# Altium PCB Custom_Keyboard.PcbDoc (part 1 of 3)
Units mil, origin at the board's own origin, x right, y up, seen from the top; angles counter-clockwise.
Board outline 3302 x 1991 mil, 2 copper layers (Top Layer, Bottom Layer), stack 57 mil thick; 188 components, 152 nets, 718 pads, 297 vias.
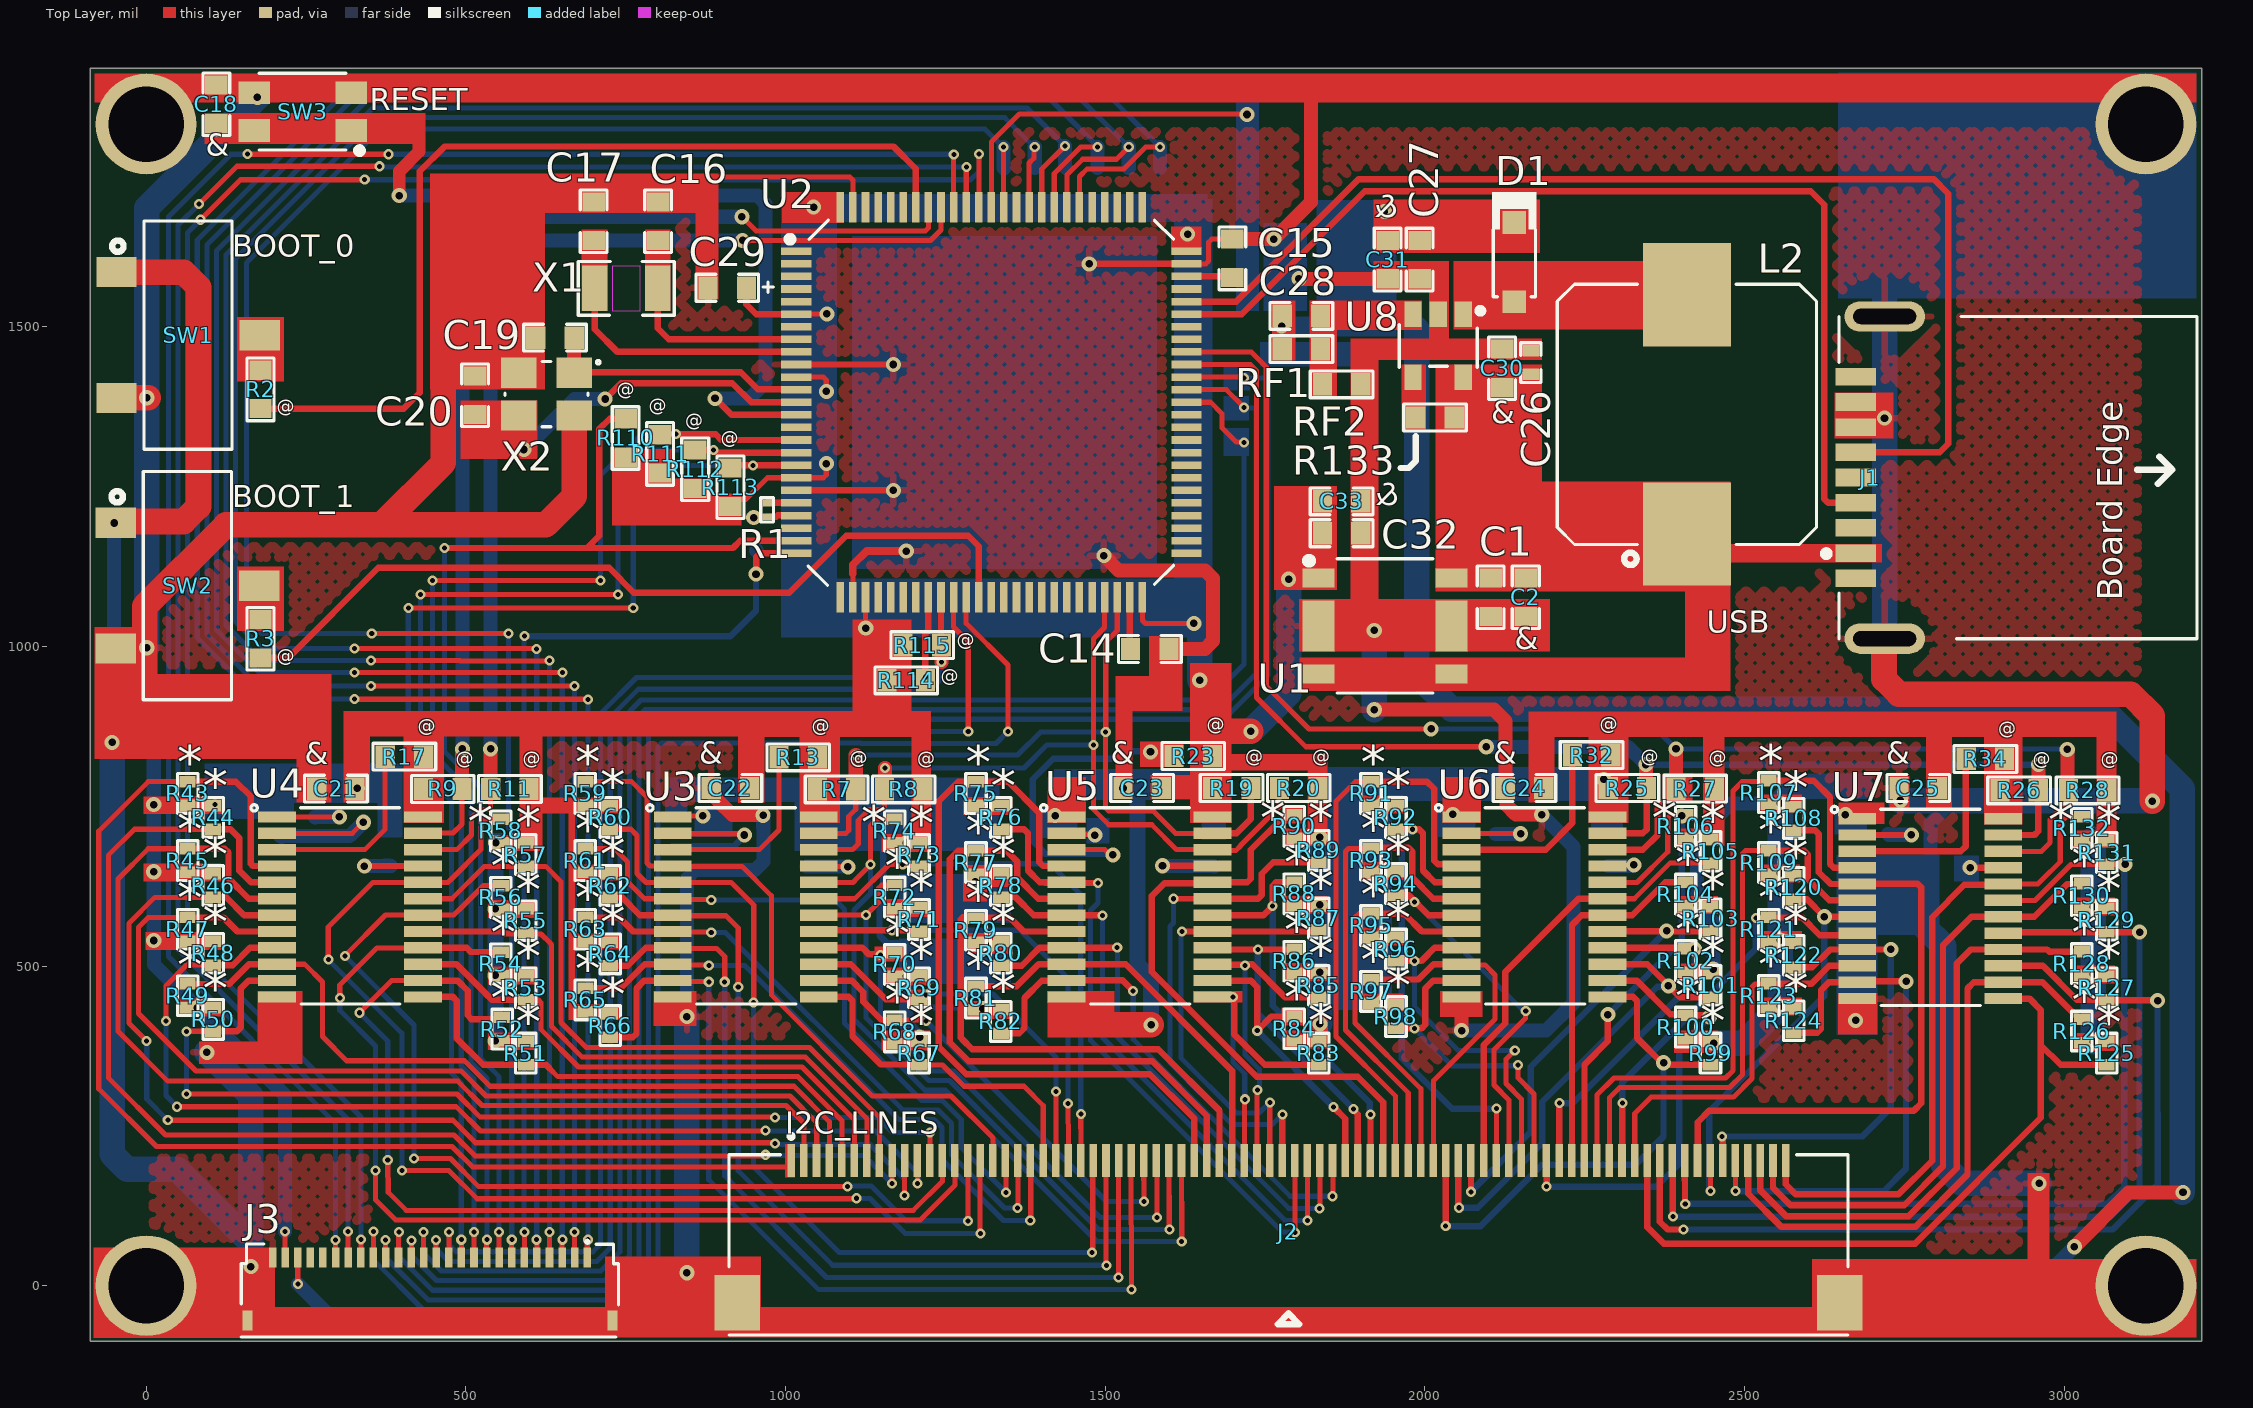
[diagram p0: Top Layer view]
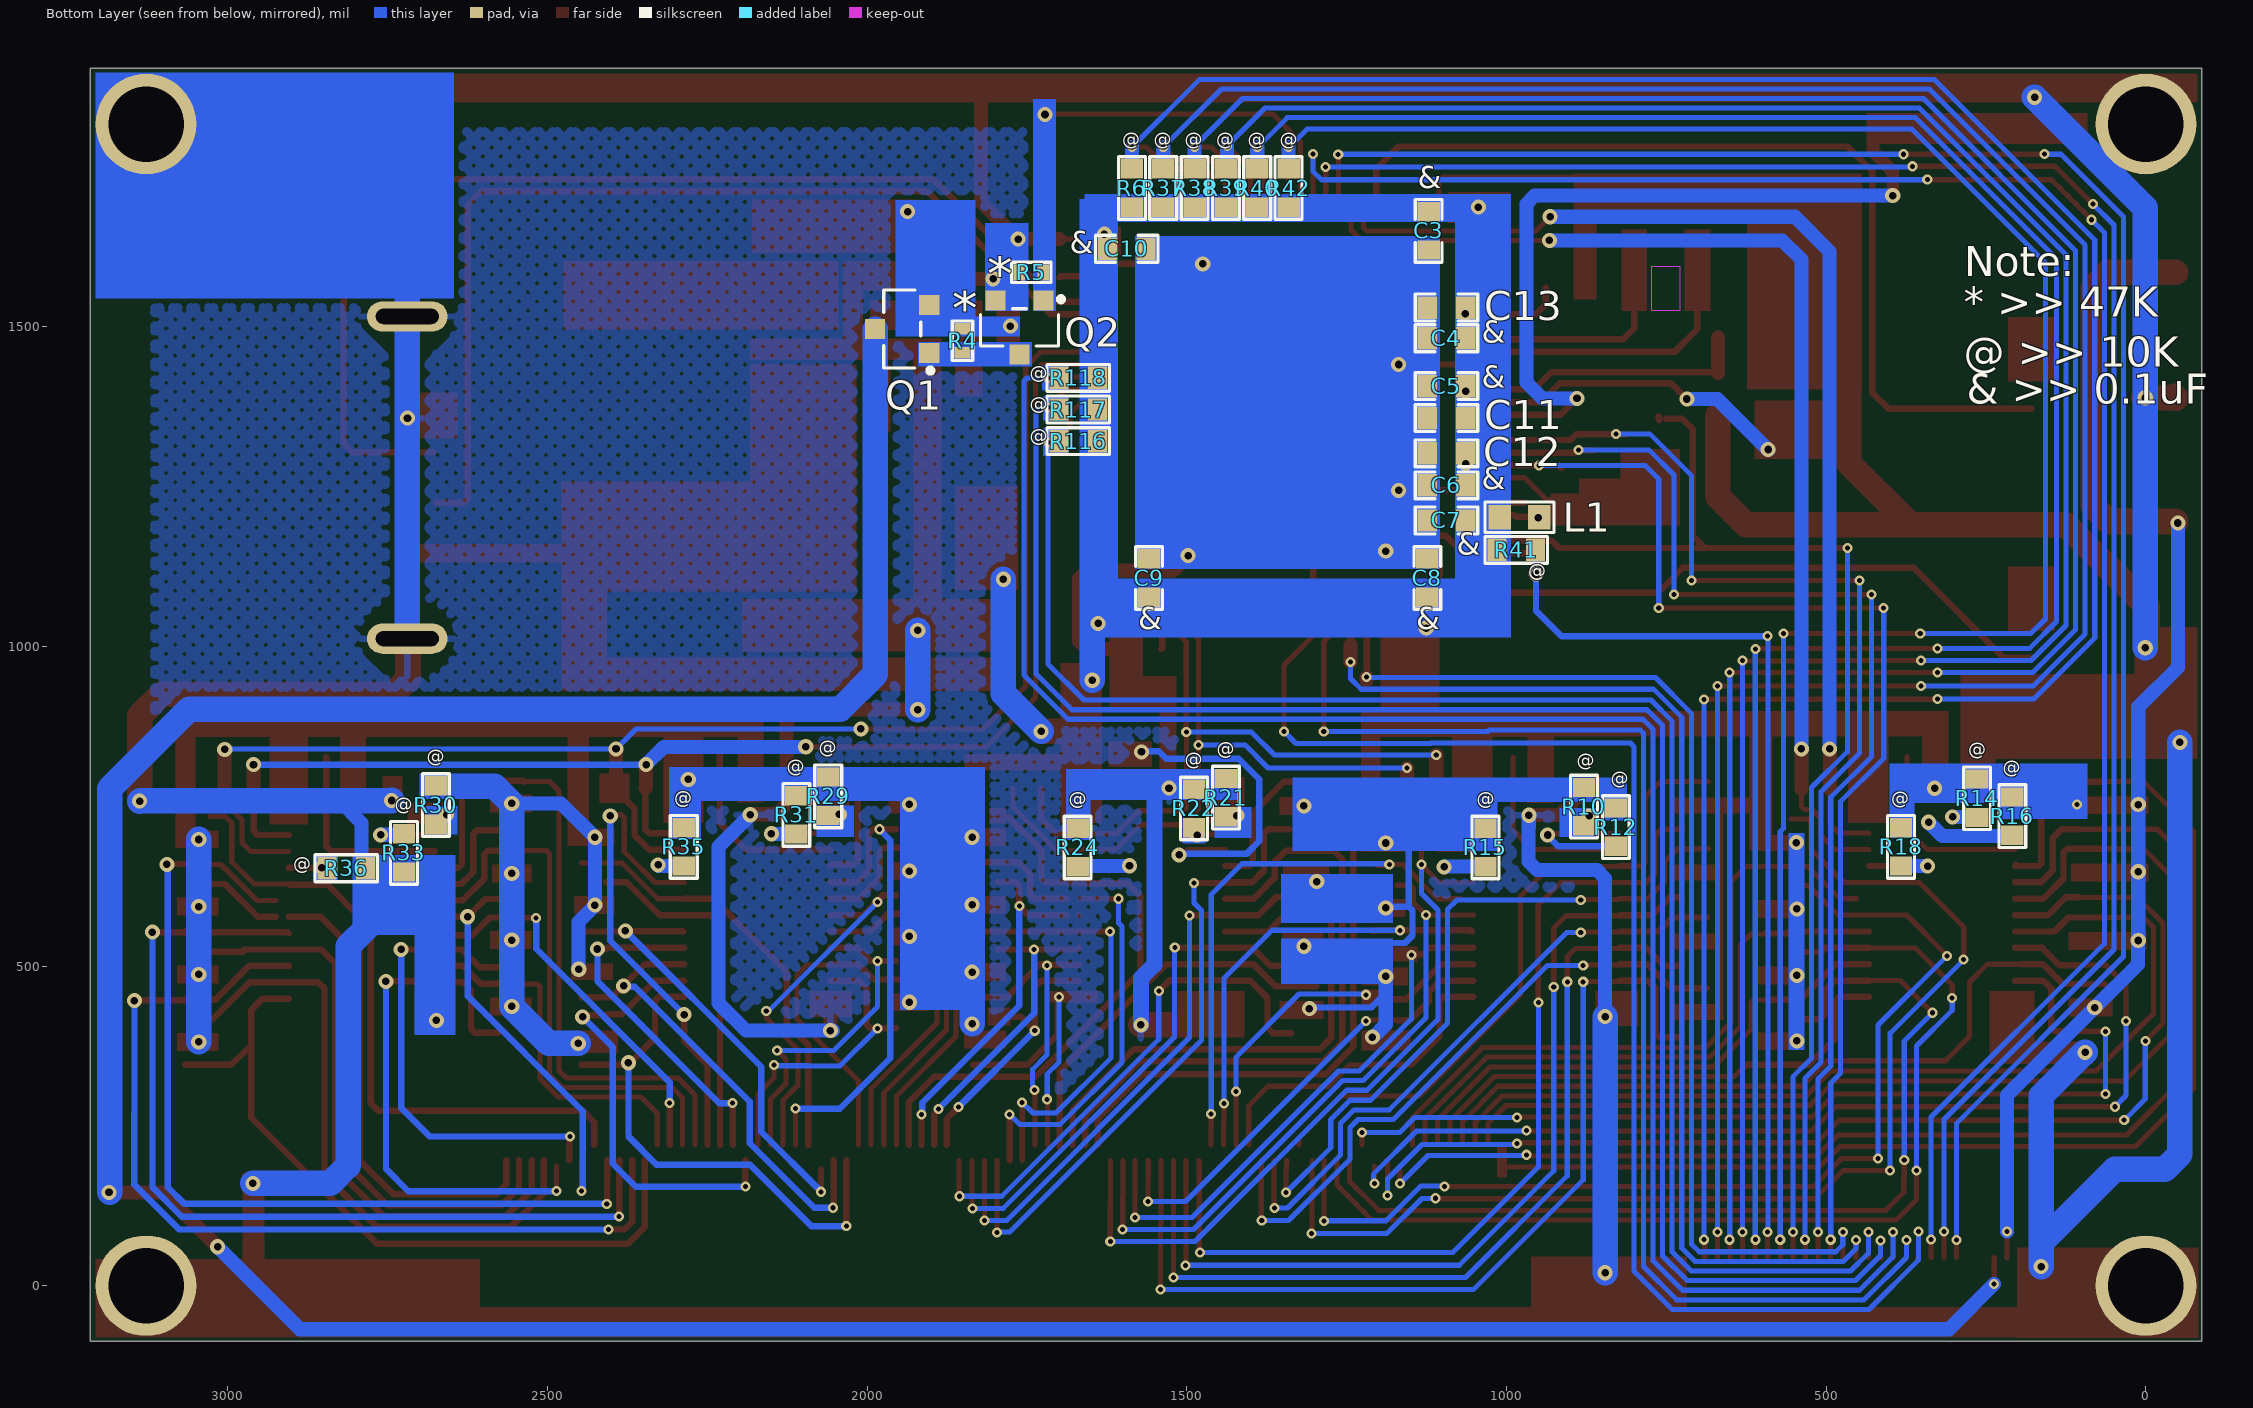
[diagram p1: Bottom Layer view, seen from below]
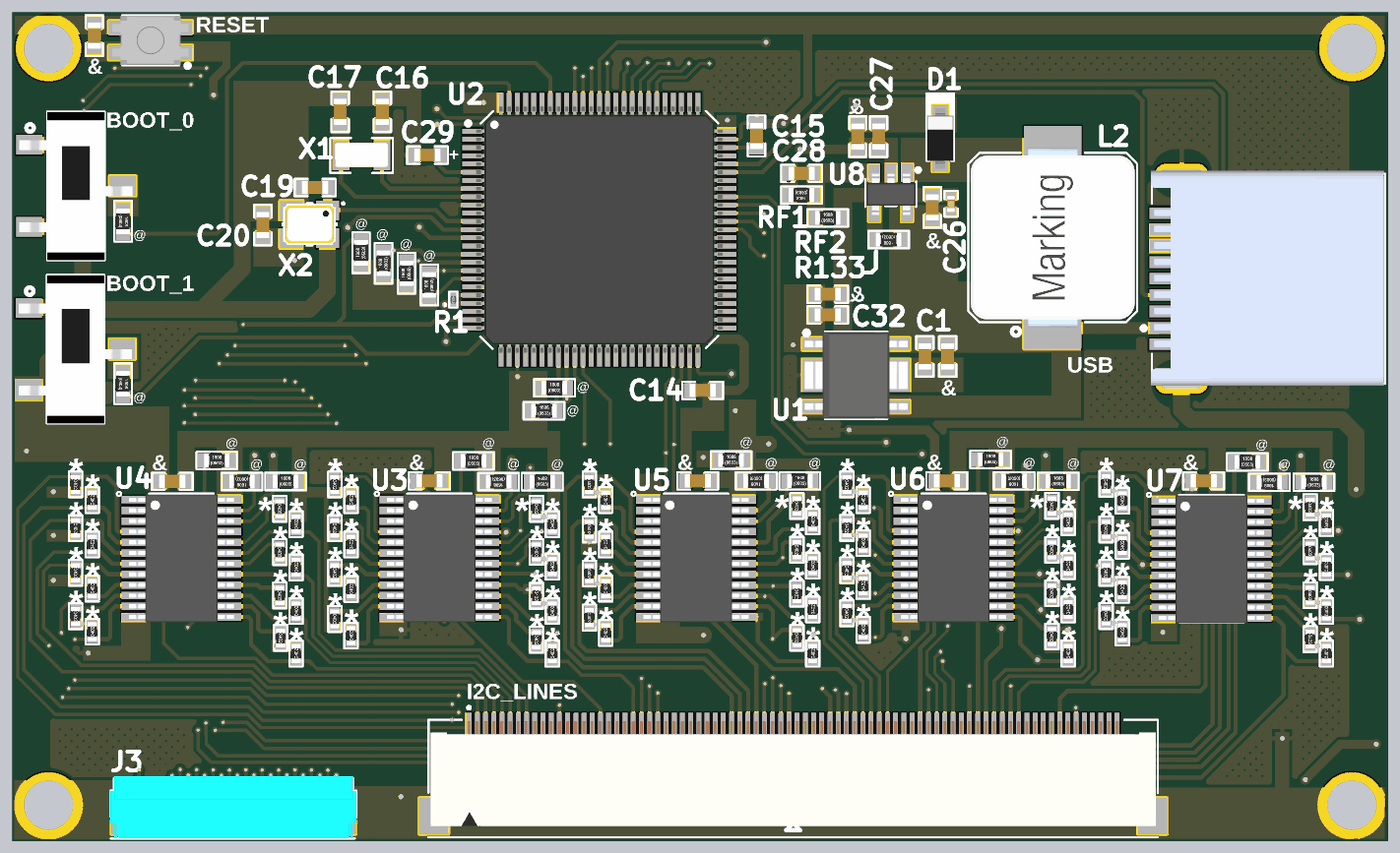
[diagram p3: 3D render of the assembled board from above, using the file's embedded part models]
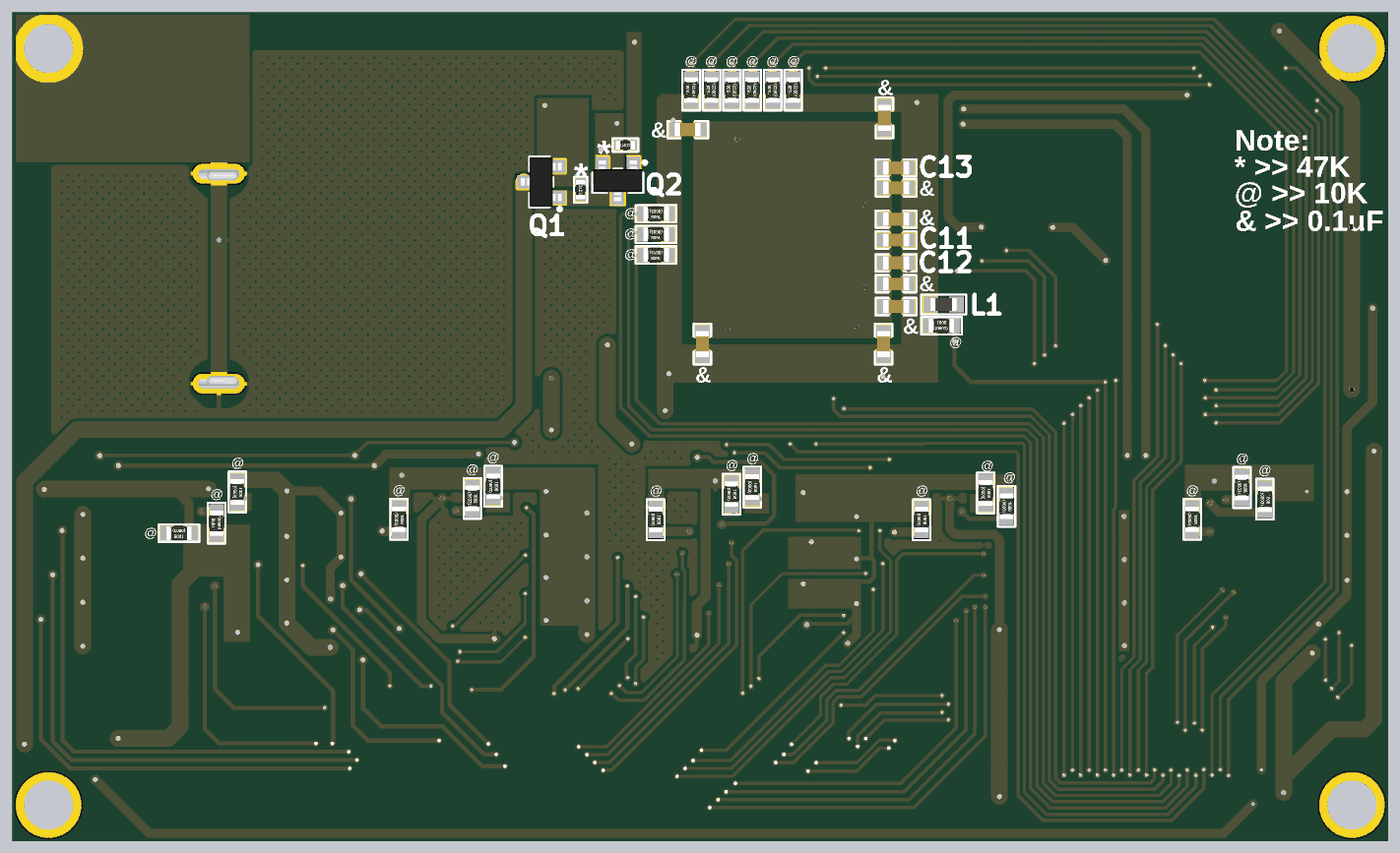
[diagram p4: 3D render of the assembled board from below, using the file's embedded part models]

## Layer stack, top to bottom
Top Solder: solder mask 3, Solder Resist, Dk 3.5
Top Layer: signal copper 10
Dielectric 1: dielectric 37, FR-4, Dk 4.8
Bottom Layer: signal copper 10
Bottom Solder: solder mask 3, Solder Resist, Dk 3.5

## Board outline
-87,-87 -87,1904 3215,1904 3215,-87

## Design rules (kind name [scope] priority, off if disabled: settings)
Clearance [All] p1: gap=7 ignorepadtopadclearanceinfootprint=FALSE except(0: Arc-Hole Track-Hole SMDPad-Hole THPad-Hole Via-Hole Fill-Hole Poly-Hole Region-Hole Text-Hole; 3: Arc-SMDPad Track-SMDPad SMDPad-SMDPad)
HoleSize [All] p1: absolutevalues=TRUE maxlimit=1000 minlimit=1 maxpercent=80.000 minpercent=20.000
HoleToHoleClearance [All] p1: gap=0 allowstackedmicrovias=TRUE
MinimumSolderMaskSliver [All] p1: minsoldermaskwidth=0
PolygonConnect [All] p1: connectstyle=Relief reliefconductorwidth=10 reliefentries=4 polygonreliefangle="90 Angle" airgapwidth=10
RoutingVias [All] p1: holewidth=11.81 width=23.62 viastyle="Through Hole" minholewidth=7.87 minwidth=15.75 maxholewidth=11.81 maxwidth=23.62
SilkToSilkClearance [All] p1: silktosilkclearance=0
SilkToSolderMaskClearance [IsPad] p1: minsilkscreentomaskgap=0 clearancetoexposedcopper=TRUE
SolderMaskExpansion [All] p1: expansion=4 istentingtop=FALSE
Width [All] p1: maxlimit=40 minlimit=8 preferedwidth=22
25 further rules are at their usual default settings.

## Classes and differential pairs
component class U_RPull_Section: R43 R44 R45 R46 R47 R48 R49 R50 R51 R52 R53 R54 R55 R56 R57 R58 R59 R60 R61 R62 R63 R64 R65 R66 R67 R68 R69 R70 R71 R72 R73 R74 R75 R76 R77 R78 R79 R80 R81 R82 R83 R84 R85 R86 R87 R88 R89 R90 R91 R92 R93 R94 R95 R96 R97 R98 R99 R100 R101 R102 R103 R104 R105 R106 R107 R108 R109 R120 R121 R122 R123 R124 R125 R126 R127 R128 R129 R130 R131 R132
component class U_Power_Section: C1 C2 C26 C27 C28 C30 C31 C32 C33 D1 L2 Q1 Q2 R4 R5 R133 RF1 RF2 U1 U8
component class U_Mux_Sheet_2: C24 C25 R25 R26 R27 R28 R29 R30 R31 R32 R33 R34 R35 R36 U6 U7
component class U_Mux_Sheet_1: C21 C22 C23 R7 R8 R9 R10 R11 R12 R13 R14 R15 R16 R17 R18 R19 R20 R21 R22 R23 R24 U3 U4 U5
component class U_Controller_Section_2: R6 R37 R38 R39 R40 R41 R42 R110 R111 R112 R113 R114 R115 R116 R117 R118
component class U_Controller_Section_1: C3 C4 C5 C6 C7 C8 C9 C10 C11 C12 C13 C14 C15 C16 C17 C18 C19 C20 C29 L1 R1 R2 R3 SW1 SW2 SW3 U2 X1 X2
component class U_Connector_Sheet: J1 J2 J3

## Components (designator, comment, footprint, x,y, rotation, side; value= is the part's Value field where it differs from the comment)
C1 "4.7UF" Cap0603#1 2103,1077 r270 top locked
C2 "0.1uF" Cap0603#1 2158,1077 r270 top locked
C3 "0.1uF" Cap0603#1 1122,1650 r270 bottom locked
C4 "0.1uF" Cap0603#1 1094,1482 r0 bottom locked
C5 "0.1uF" Cap0603#1 1094,1407 r0 bottom locked
C6 "0.1uF" Cap0603#1 1094,1252 r0 bottom locked
C7 "0.1uF" Cap0603#1 1094,1197 r0 bottom locked
C8 "0.1uF" Cap0603#1 1124,1107 r90 bottom locked
C9 "0.1uF" Cap0603#1 1559,1107 r90 bottom locked
C10 "0.1uF" Cap0603#1 1594,1622 r180 bottom locked
C11 "1uF" Cap0603#1 1094,1357 r0 bottom locked
C12 "1uF" Cap0603#1 1094,1302 r0 bottom locked
C13 "4.7UF" Cap0603#1 1094,1530 r0 bottom locked
C14 "2.2uF" Cap0603#1 1570,996 r0 top locked
C15 "2.2uF" Cap0603#1 1699,1607 r90 top locked
C16 "10pF" Cap0603#1 801,1665 r270 top locked
C17 "10pF" Cap0603#1 700,1665 r270 top locked
C18 "0.1uF" Cap0603#1 110,1848 r90 top locked
C19 "10pF" Cap0603#1 639.61,1482.93 r0 top locked
C20 "10pF" Cap0603#1 514.61,1392.93 r270 top locked
C21 "0.1uF" Cap0603#1 297,777.5 r180 top locked
C22 "0.1uF" Cap0603#2 914,778.5 r180 top locked
C23 "0.1uF" Cap0603#2 1558,778.5 r180 top locked
C24 "0.1uF" Cap0603#2 2156,778.5 r180 top locked
C25 "0.1uF" Cap0603#1 2772,778.5 r180 top locked
C26 "2.2uF" "Cap 0402" 2166,1444 r90 top locked
C27 "10uF" Cap0603#1 1992,1605 r270 top locked
C28 "220pF" Cap0603#1 1807,1517 r180 top locked
C29 "1uF" F981E105MMA 909,1561 r180 top locked
C30 "0.1uF" Cap0603#1 2121,1435 r90 top locked
C31 "0.1uF" Cap0603#1 1942,1605 r270 top locked
C32 "4.7UF" Cap0603#1 1870,1177 r0 top locked
C33 "0.1uF" Cap0603#1 1870,1227 r0 top locked
D1 "MBR0520" SOD123 2140,1600.99 r90 top locked
J1 "U231-091N-4BLRA00-S" U231-091N-4BLRA00-S 2802.94,1264.11 r90 top
J2 "046288080000846+" 046288080000846+ 1786.84,84.79 r0 top locked
J3 "FH34SRJ-26S-0.5SH(50)" FH34SRJ-26S-0.5SH(50) 444.01,-5.21 r0 top locked
L1 "FBMH1608HL121-TV" "IND 0603" 979.91,1202 r180 bottom locked
L2 "3.3UH" 74437368033 2410,1363 r90 top locked
Q1 "FDN338P" SOT23-3 1945.32,1496.41 r90 bottom locked
Q2 "FDN335N" SOT23-3 1762,1499 r0 bottom locked
R1 "0R" Res-0201 971.39,1213.57 r270 top locked
R2 "10K" Res0603 179,1402 r90 top locked
R3 "10K" Res0603 179,1012 r90 top locked
R4 "47K" Res0402#1 1851,1478 r270 bottom locked
R5 "47K" Res0402#1 1743.5,1585 r180 bottom locked
R6 "10K" Res0603 1586,1717 r270 bottom locked
R7 "10K" Res0603 1080,776.5 r0 top locked
R8 "10K" Res0603 1185,776.5 r180 top locked
R9 "10K" Res0603 464,777 r0 top locked
R10 "10K" Res0603 879,749.5 r90 bottom locked
R11 "10K" Res0603 569,777 r180 top locked
R12 "10K" Res0603 829,717.5 r90 bottom locked
R13 "10K" Res0603 1020,826.5 r180 top locked
R14 "10K" Res0603 264,762.5 r90 bottom locked
R15 "10K" Res0603 1033,685.5 r90 bottom locked
R16 "10K" Res0603 209,734.5 r90 bottom locked
R17 "10K" Res0603 404,827.5 r180 top locked
R18 "10K" Res0603 383,686.5 r90 bottom locked
R19 "10K" Res0603 1698,778.5 r0 top locked
R20 "10K" Res0603 1803,778.5 r180 top locked
R21 "10K" Res0603 1439,763.5 r90 bottom locked
R22 "10K" Res0603 1489,746.5 r90 bottom locked
R23 "10K" Res0603 1638,828.5 r180 top locked
R24 "10K" Res0603 1671,685.5 r90 bottom locked
R25 "10K" Res0603 2317,778.5 r0 top locked
R26 "10K" Res0603 2929.65,774.93 r0 top locked
R27 "10K" Res0603 2423,777.5 r180 top locked
R28 "10K" Res0603 3036.65,774.93 r180 top locked
R29 "10K" Res0603 2061,765.5 r90 bottom locked
R30 "10K" Res0603 2674.65,751.93 r90 bottom locked
R31 "10K" Res0603 2111,736.5 r90 bottom locked
R32 "10K" Res0603 2261,830 r180 top locked
R33 "10K" Res0603 2724.65,676.93 r270 bottom locked
R34 "10K" Res0603 2877,824 r180 top locked
R35 "10K" Res0603 2287,686.5 r90 bottom locked
R36 "10K" Res0603 2815,653 r180 bottom locked
R37 "10K" Res0603 1537,1717 r270 bottom locked
R38 "10K" Res0603 1488,1717 r270 bottom locked
R39 "10K" Res0603 1439,1717 r270 bottom locked
R40 "10K" Res0603 1390,1717 r270 bottom locked
R41 "10K" Res0603 985,1151 r0 bottom
R42 "10K" Res0603 1341,1717 r270 bottom locked
R43 "47K" Res0402#1 65,770 r270 top locked
R44 "47K" Res0402#1 105,732.5 r90 top locked
R45 "47K" Res0402#1 65,665 r270 top locked
R46 "47K" Res0402#1 105,626 r90 top locked
R47 "47K" Res0402#1 65,557.5 r270 top locked
R48 "47K" Res0402#1 105,520 r90 top locked
R49 "47K" Res0402#1 65,453.5 r270 top locked
R50 "47K" Res0402#1 105,416.5 r90 top locked
R51 "47K" Res0402#1 594,363.93 r90 top locked
R52 "47K" Res0402#1 557,401.5 r270 top locked
R53 "47K" Res0402#1 594,466 r90 top locked
R54 "47K" Res0402#1 555,503.5 r270 top locked
R55 "47K" Res0402#1 594,571 r90 top locked
R56 "47K" Res0402#1 555,607.5 r270 top locked
R57 "47K" Res0402#1 594,674.5 r90 top locked
R58 "47K" Res0402#1 555,711.5 r270 top locked
R59 "47K" Res0402#2 687,770 r270 top locked
R60 "47K" Res0402#2 726,732.5 r90 top locked
R61 "47K" Res0402#3 687,665 r270 top locked
R62 "47K" Res0402#1 726,626 r90 top locked
R63 "47K" Res0402#1 687,557.5 r270 top locked
R64 "47K" Res0402#2 726,519 r90 top locked
R65 "47K" Res0402#2 687,447 r270 top locked
R66 "47K" Res0402#2 726,407 r90 top locked
R67 "47K" Res0402#1 1209,363.93 r90 top locked
R68 "47K" Res0402#2 1171,397 r270 top locked
R69 "47K" Res0402#2 1209,466 r90 top locked
R70 "47K" Res0402#2 1171,502.5 r270 top locked
R71 "47K" Res0402#2 1209,573 r90 top locked
R72 "47K" Res0402#2 1171,608 r270 top locked
R73 "47K" Res0402#2 1209,674.5 r90 top locked
R74 "47K" Res0402#2 1171,711.5 r270 top locked
R75 "47K" Res0402#2 1298,770 r270 top locked
R76 "47K" Res0402#2 1337,732.5 r90 top locked
R77 "47K" Res0402#2 1298,662 r270 top locked
R78 "47K" Res0402#2 1337,626 r90 top locked
R79 "47K" Res0402#2 1298,556 r270 top locked
R80 "47K" Res0402#2 1337,520 r90 top locked
R81 "47K" Res0402#2 1298,450 r270 top locked
R82 "47K" Res0402#1 1337,413.5 r90 top locked
R83 "47K" Res0402#1 1834,363.93 r90 top locked
R84 "47K" Res0402#2 1796,402 r270 top locked
R85 "47K" Res0402#2 1834,470 r90 top locked
R86 "47K" Res0402#2 1796,507.5 r270 top locked
R87 "47K" Res0402#2 1834,575 r90 top locked
R88 "47K" Res0402#2 1796,613 r270 top locked
R89 "47K" Res0402#2 1834,681 r90 top locked
R90 "47K" Res0402#2 1796,718.5 r270 top locked
R91 "47K" Res0402#2 1916,770 r270 top locked
R92 "47K" Res0402#2 1955,732.5 r90 top locked
R93 "47K" Res0402#2 1916,665.5 r270 top locked
R94 "47K" Res0402#2 1955,629 r90 top locked
R95 "47K" Res0402#2 1916,563.5 r270 top locked
R96 "47K" Res0402#2 1955,526.5 r90 top locked
R97 "47K" Res0402#2 1916,460.5 r270 top locked
R98 "47K" Res0402#2 1955,421 r90 top locked
R99 "47K" Res0402#2 2447,363.93 r90 top locked
R100 "47K" Res0402#2 2408,404.5 r270 top locked
R101 "47K" Res0402#2 2447,470 r90 top locked
R102 "47K" Res0402#2 2408,508.5 r270 top locked
R103 "47K" Res0402#2 2447,574 r90 top locked
R104 "47K" Res0402#2 2408,612.5 r270 top locked
R105 "47K" Res0402#2 2447,679.5 r90 top locked
R106 "47K" Res0402#2 2408,718.5 r270 top locked
R107 "47K" Res0402#1 2538,771.43 r270 top locked
R108 "47K" Res0402#1 2577,730.93 r90 top locked
R109 "47K" Res0402#1 2538,662 r270 top locked
R110 "10K" Res0603 750,1326 r270 top locked
R111 "10K" Res0603 804,1301 r270 top locked
R112 "10K" Res0603 859,1277 r270 top locked
R113 "10K" Res0603 914,1249 r270 top locked
R114 "10K" Res0603 1189,947 r180 top locked
R115 "10K" Res0603 1214,1002 r180 top locked
R116 "10K" Res0603 1670,1321 r180 bottom locked
R117 "10K" Res0603 1670,1370.5 r180 bottom locked
R118 "10K" Res0603 1670,1420 r180 bottom locked
R120 "47K" Res0402#1 2577,623 r90 top locked
R121 "47K" Res0402#1 2538,557.5 r270 top locked
R122 "47K" Res0402#1 2577,517 r90 top locked
R123 "47K" Res0402#1 2538,453.93 r270 top locked
R124 "47K" Res0402#1 2577,414.43 r90 top locked
R125 "47K" Res0402#1 3066.65,363.93 r90 top locked
R126 "47K" Res0402#1 3027.65,398.43 r270 top locked
R127 "47K" Res0402#1 3066.65,465.93 r90 top locked
R128 "47K" Res0402#1 3027.65,503.93 r270 top locked
R129 "47K" Res0402#1 3066.65,571.93 r90 top locked
R130 "47K" Res0402#1 3027.65,609.93 r270 top locked
R131 "47K" Res0402#1 3066.65,677.43 r90 top locked
R132 "47K" Res0402#1 3027.65,715.43 r270 top locked
R133 "51K" Res0603 2016,1358 r0 top locked
RF1 "68K" Res0603 1807,1465 r0 top locked
RF2 "13.3K" Res0603 1870,1410 r180 top locked
SW1 "SS-3235D-03-L2" SS-3235D-03-L2 65.8,1487 r270 top locked
SW2 "SS-3235D-03-L2" SS-3235D-03-L2 64.8,1095 r270 top locked
SW3 "TS-1185EC-C-D-B" TS-1185EC-C-D-B 244.79,1836.47 r180 top locked
U1 "S-1172B33-E6T1U" HSOP-6 1938,1032 r0 top locked
U2 "STM32F407VGT7TR" LQFP-100 1322.11,1381.88 r0 top locked
U3 "TCA9548APWR" 24-TSSOP 938,592.5 r0 top locked
U4 "TCA9548APWR" 24-TSSOP 319,592.5 r0 top locked
U5 "TCA9548APWR" 24-TSSOP 1554,592.5 r0 top locked
U6 "TCA9548APWR" 24-TSSOP 2171.83,592.5 r0 top locked
U7 "TCA9548APWR" 24-TSSOP 2790.83,589.93 r0 top locked
U8 "LM27313XMF/NOPB" SOT23-5 2021,1470 r270 top locked
X1 "32.768KHz" Q13FC1350000200 751,1560 r180 top locked
X2 "25MHz" S3225000101040 626.31,1394.46 r180 top locked

## Footprints (in the part's own frame and the unit in brackets; to place one, negate y for a bottom-side part, rotate by r counter-clockwise, add the part's x,y. Pads: shape width x height; smd on the part's side, far side on the other; paste and mask are expansions set on the pad)
24-TSSOP [mm] "IC BUS SWITCH 1 X 8:1 24TSSOP"
  rect 1.5x0.45 smd: 1(-2.9,3.575) 2(-2.9,2.925) 3(-2.9,2.275) 4(-2.9,1.625) 5(-2.9,0.975) 6(-2.9,0.325) 7(-2.9,-0.325) 8(-2.9,-0.975) 9(-2.9,-1.625) 10(-2.9,-2.275) 11(-2.9,-2.925) 12(-2.9,-3.575) 13(2.9,-3.575) 14(2.9,-2.925) 15(2.9,-2.275) 16(2.9,-1.625) 17(2.9,-0.975) 18(2.9,-0.325) 19(2.9,0.325) 20(2.9,0.975) 21(2.9,1.625) 22(2.9,2.275) 23(2.9,2.925) 24(2.9,3.575)
  silkscreen extent -3.94,-3.85 1.99,4.06, body extent -3.2,-3.9 3.2,3.9, height 1.2
74437368033 [mm]
  rect 4.1x3.5 smd: 1(-4.75,0) 2(4.75,0)
  silkscreen extent -5.99,-5.15 5.17,5.15, body extent -5.5,-5 5.5,5, height 3.7
046288080000846+ [mm]
  rect 0.3x1.3 smd: 1(-19.75,2.825) 2(-19.25,2.825) 3(-18.75,2.825) 4(-18.25,2.825) 5(-17.75,2.825) 6(-17.25,2.825) 7(-16.75,2.825) 8(-16.25,2.825) 9(-15.75,2.825) 10(-15.25,2.825) 11(-14.75,2.825) 12(-14.25,2.825) 13(-13.75,2.825) 14(-13.25,2.825) 15(-12.75,2.825) 16(-12.25,2.825) 17(-11.75,2.825) 18(-11.25,2.825) 19(-10.75,2.825) 20(-10.25,2.825) 21(-9.75,2.825) 22(-9.25,2.825) 23(-8.75,2.825) 24(-8.25,2.825) 25(-7.75,2.825) 26(-7.25,2.825) 27(-6.75,2.825) 28(-6.25,2.825) 29(-5.75,2.825) 30(-5.25,2.825) 31(-4.75,2.825) 32(-4.25,2.825) 33(-3.75,2.825) 34(-3.25,2.825) 35(-2.75,2.825) 36(-2.25,2.825) 37(-1.75,2.825) 38(-1.25,2.825) 39(-0.75,2.825) 40(-0.25,2.825) 41(0.25,2.825) 42(0.75,2.825) 43(1.25,2.825) 44(1.75,2.825) 45(2.25,2.825) 46(2.75,2.825) 47(3.25,2.825) 48(3.75,2.825) 49(4.25,2.825) 50(4.75,2.825) 51(5.25,2.825) 52(5.75,2.825) 53(6.25,2.825) 54(6.75,2.825) 55(7.25,2.825) 56(7.75,2.825) 57(8.25,2.825) 58(8.75,2.825) 59(9.25,2.825) 60(9.75,2.825) 61(10.25,2.825) 62(10.75,2.825) 63(11.25,2.825) 64(11.75,2.825) 65(12.25,2.825) 66(12.75,2.825) 67(13.25,2.825) 68(13.75,2.825) 69(14.25,2.825) 70(14.75,2.825) 71(15.25,2.825) 72(15.75,2.825) 73(16.25,2.825) 74(16.75,2.825) 75(17.25,2.825) 76(17.75,2.825) 77(18.25,2.825) 78(18.75,2.825) 79(19.25,2.825) 80(19.75,2.825)
  rect 1.8x2.2 smd: MP1(-21.9,-2.825) MP2(21.9,-2.825)
  silkscreen extent -22.22,-4.11 22.23,3.84, body extent -22.1,-3.43 22.1,2.97, height 2.1
Cap0603#1 [mil]
  rect 30x35 smd mask+2.36: 1(-30,0) 2(30,0)
  silkscreen extent -49,-21 49,21, body extent -32,-16 31,16, height 34
Cap0603#2 [mil]
  rect 30x35 smd: 1(-30,0) 2(30,0)
  silkscreen extent -49,-21 49,21, body extent -32,-16 31,16, height 34
"Cap 0402" [mil]
  rect 18x25 smd mask+2.36: 1(-18.5,0) 2(18.5,0)
  silkscreen extent -31,-16 31,16, body extent -20,-10 20,10, height 19
F981E105MMA [mil]
  rect 30x35 smd mask+2.36: 1(-30,0) 2(30,0)
  silkscreen extent -72,-21 49,21, body extent -32,-16 31,16, height 34
FH34SRJ-26S-0.5SH(50) [mm] "CONN FFC FPC 26POS 0.50MM R/A"
  rect 0.3x0.8 smd: 1(6.25,1.25) 2(5.75,1.25) 3(5.25,1.25) 4(4.75,1.25) 5(4.25,1.25) 6(3.75,1.25) 7(3.25,1.25) 8(2.75,1.25) 9(2.25,1.25) 10(1.75,1.25) 11(1.25,1.25) 12(0.75,1.25) 13(0.25,1.25) 14(-0.25,1.25) 15(-0.75,1.25) 16(-1.25,1.25) 17(-1.75,1.25) 18(-2.25,1.25) 19(-2.75,1.25) 20(-3.25,1.25) 21(-3.75,1.25) 22(-4.25,1.25) 23(-4.75,1.25) 24(-5.25,1.25) 25(-5.75,1.25) 26(-6.25,1.25)
  rect 0.4x0.8 smd: MP1(-7.25,-1.25) MP2(7.25,-1.25)
  silkscreen extent -7.49,-1.91 7.49,1.94, body extent -7.5,-1.9 7.5,1.9, height 1
HSOP-6 [mm] "1A 60dB@(1kHz) 100mV@(300mA) Fixed 3.3V~3.3V Positive 1 5.5V HSOP-6"
  rect 1.27x0.76 smd: 1(-2.64,1.91) 3(-2.64,-1.91) 4(2.64,-1.91) 6(2.64,1.91)
  rect 1.27x2.03 smd: 2(-2.64,0) 5(2.64,0)
  silkscreen extent -3.15,-2.67 1.91,2.72, body extent -3.14,-2.65 3.14,2.65, height 1.6
"IND 0603" [mm]
  rect 0.9x0.97 smd: 1(-0.785,0) 2(0.785,0)
  silkscreen extent -1.37,-0.61 1.37,0.61, body extent -0.8,-0.4 0.8,0.4, height 0.76
LQFP-100 [mm]
  rect 1.2x0.3 smd: 1(-7.75,6) 2(-7.75,5.5) 3(-7.75,5) 4(-7.75,4.5) 5(-7.75,4) 6(-7.75,3.5) 7(-7.75,3) 8(-7.75,2.5) 9(-7.75,2) 10(-7.75,1.5) 11(-7.75,1) 12(-7.75,0.5) 13(-7.75,0) 14(-7.75,-0.5) 15(-7.75,-1) 16(-7.75,-1.5) 17(-7.75,-2) 18(-7.75,-2.5) 19(-7.75,-3) 20(-7.75,-3.5) 21(-7.75,-4) 22(-7.75,-4.5) 23(-7.75,-5) 24(-7.75,-5.5) 25(-7.75,-6) 51(7.75,-6) 52(7.75,-5.5) 53(7.75,-5) 54(7.75,-4.5) 55(7.75,-4) 56(7.75,-3.5) 57(7.75,-3) 58(7.75,-2.5) 59(7.75,-2) 60(7.75,-1.5) 61(7.75,-1) 62(7.75,-0.5) 63(7.75,0) 64(7.75,0.5) 65(7.75,1) 66(7.75,1.5) 67(7.75,2) 68(7.75,2.5) 69(7.75,3) 70(7.75,3.5) 71(7.75,4) 72(7.75,4.5) 73(7.75,5) 74(7.75,5.5) 75(7.75,6)
  rect 0.3x1.2 smd: 26(-6,-7.75) 27(-5.5,-7.75) 28(-5,-7.75) 29(-4.5,-7.75) 30(-4,-7.75) 31(-3.5,-7.75) 32(-3,-7.75) 33(-2.5,-7.75) 34(-2,-7.75) 35(-1.5,-7.75) 36(-1,-7.75) 37(-0.5,-7.75) 38(0,-7.75) 39(0.5,-7.75) 40(1,-7.75) 41(1.5,-7.75) 42(2,-7.75) 43(2.5,-7.75) 44(3,-7.75) 45(3.5,-7.75) 46(4,-7.75) 47(4.5,-7.75) 48(5,-7.75) 49(5.5,-7.75) 50(6,-7.75) 76(6,7.75) 77(5.5,7.75) 78(5,7.75) 79(4.5,7.75) 80(4,7.75) 81(3.5,7.75) 82(3,7.75) 83(2.5,7.75) 84(2,7.75) 85(1.5,7.75) 86(1,7.75) 87(0.5,7.75) 88(0,7.75) 89(-0.5,7.75) 90(-1,7.75) 91(-1.5,7.75) 92(-2,7.75) 93(-2.5,7.75) 94(-3,7.75) 95(-3.5,7.75) 96(-4,7.75) 97(-4.5,7.75) 98(-5,7.75) 99(-5.5,7.75) 100(-6,7.75)
  silkscreen extent -8.13,-7.27 7.24,7.24, body extent -8,-8 8,8, height 1.6
Q13FC1350000200 [mm] "CRYSTAL 32.7680KHZ 7PF SMD"
  rect 1x1.8 smd: 1(-1.25,0) 2(1.25,0)
  Keep-Out Layer region: -0.559,-0.889 0.559,-0.889 0.559,0.889 -0.559,0.889
  silkscreen extent -1.91,-1.07 1.91,1.07, body extent -1.6,-0.78 1.6,0.72, height 0.87
Res0402#1 [mil]
  rect 18x25 smd mask+4: 1(-18.5,0) 2(18.5,0)
  silkscreen extent -32,-17 32,16, body extent -23,-11 23,11, height 16
Res0402#2 [mil]
  rect 18x25 smd: 1(-18.5,0) 2(18.5,0)
  silkscreen extent -32,-17 32,16, body extent -23,-11 23,11, height 16
Res0402#3 [mil]
  rect 18x25 smd mask+4: 1(-18.5,0)
  rect 18x25 smd: 2(18.5,0)
  silkscreen extent -32,-17 32,16, body extent -23,-11 23,11, height 16
Res0603 [mil]
  rect 30x35 smd: 1(-30,0) 2(30,0)
  silkscreen extent -49,-21 49,21, body extent -31,-17 31,17, height 18
Res-0201 [mm]
  rect 0.27x0.37 smd: 1(-0.275,0) 2(0.275,0)
  silkscreen extent -0.48,-0.25 0.48,0.25, body extent -0.3,-0.15 0.3,0.15, height 0.29
S3225000101040 [mm] "25MHz SMD Crystal Resonator 10pF 40O ±10ppm"
  rect 1.4x1.2 smd: 1(-1.1,-0.85) 2(1.1,-0.85) 3(1.1,0.85) 4(-1.1,0.85)
  silkscreen extent -2.13,-1.34 1.65,1.3, body extent -1.6,-1.25 1.6,1.25, height 0.82
SOD123 [mm]
  rect 0.9x0.95 smd: 1(-1.575,0) 2(1.575,0)
  silkscreen extent -1.37,-0.89 2.79,0.89, body extent -1.85,-0.8 1.85,0.8, height 1.27
SOT23-3 [mm] "SOT23, 3-Leads, Body 2.9x1.3mm, Pitch 0.95mm, Lead Span 2.3mm - Reverse Pinning, IPC High Density"
  rect 0.8x0.8 smd: 1(-0.95,-1.075) 2(0.95,-1.075) 3(0,1.075)
  silkscreen extent -1.73,-1.19 1.55,0.74, body extent -1.5,-1.25 1.5,1.25, height 1.05
SOT23-5 [mil] "SOT23-5 Package"
  rect 40x27 smd: 1(-49.21,39.37) 2(-49.21,0) 3(-49.21,-39.37) 4(49.21,-39.37) 5(49.21,39.37)
  silkscreen extent -59,-61 33,70, body extent -46,-58 53,60, height 43
SS-3235D-03-L2 [mm] "SPDT 50mA @ 12VDC 12V On-On SMD Toggle Switches RoHS"
  rect 1.2x1.6 smd: 1(-2.5,-2.85) 3(2.5,-2.85)
  rect 1.21x1.6 smd: 2(0,2.85)
  silkscreen extent -4.53,-3.02 4.54,1.75, body extent -4.5,-3.45 4.55,3.45, height 6.4
TS-1185EC-C-D-B [mm]
  rect 1.25x0.9 smd: 1(-1.925,0.75) 1(1.925,0.75) 2(-1.925,-0.75) 2(1.925,-0.75)
  silkscreen extent -2.39,-1.52 1.73,1.68, body extent -2.33,-1.5 2.32,1.5, height 2
U231-091N-4BLRA00-S [mm] "USB 3.0 1 Surface Mount 9 Female -40?~+85? Type-A SMD USB Connectors ROHS"
  rect 0.7x1.6 smd: 1(-3,3.275) 2(-1,3.275) 3(1,3.275) 4(3,3.275) 5(4,3.275) 6(2,3.275) 7(0,3.275) 8(-2,3.275) 9(-4,3.275)
  oval 1.2x3.2 hole 0.6 slot 2.5 at 90 deg: MH1(-6.4,2.125) MH2(6.4,2.125)
  silkscreen extent -6.4,-10.28 6.4,4.57, body extent -6.52,-10.2 6.58,4, height 6.98

## Part data
C1 C13 C32: library part CL10A475KA8NQNC, "CAP CER 4.7UF 25V X5R 0603", Capacitance=4.7uF, Case Code (Imperial)=0603, Case Code (Metric)=1608, Dielectric=X5R, Manufacturer=Samsung, Max Operating Temperature=85°C, Min Operating Temperature=-55°C, Package Quantity=1, Supplier Part Number 1=1276-1900-1-ND, Tolerance=10%, Voltage Rating=25V, Case/Package=0603, ComponentLink1Description=http://www.samsungsem.com/kr/support/product-search/mlcc/CL10A475KA8NQNC.jsp?src-supplier=Digi-Key, ComponentLink1URL=http://www.samsungsem.com/kr/support/product-search/mlcc/CL10A475KA8NQNC.jsp?src-supplier=Digi-Key, Contact Plating=Tin, Depth=0.8mm, Lead Free="Lead Free", Length=1.6mm, Manufacturer Part Number=CL10A475KA8NQNC, Mount="Surface Mount", Packaging="Tape and Reel", Pricing 1="1=0.37, 10=0.255, 100=0.1528, 500=0.11456, 1000=0.09675 (USD)", Stock 1=2252340, Supplier 1=Digi-Key, Termination=Wraparound, Thickness=0.035inch, Width=0.031inch
C2 C3 C4 C5 C6 C7 C8 C9 C10 C18 C21 C22 C23 C24 C25 C30 C31 C33: library part CC0603ZRY5V9BB104, "CAP CER 0.1UF 50V Y5V 0603", Capacitance=100nF, Case Code (Imperial)=0603, Case Code (Metric)=1608, Dielectric=Y5V, Manufacturer=Yageo, Max Operating Temperature=85°C, Min Operating Temperature=-30°C, Package Quantity=1, Supplier Part Number 1=311-1343-1-ND, Tolerance=80%, Voltage=50V, Case/Package=0603, ComponentLink1Description=http://www.yageo.com/documents/recent/UPY-GPHC_Y5V_6.3V-to-50V_8.pdf?src-supplier=Digi-Key, ComponentLink1URL=http://www.yageo.com/documents/recent/UPY-GPHC_Y5V_6.3V-to-50V_8.pdf?src-supplier=Digi-Key, ComponentLink2Description=http://www.yageo.com/documents/recent/UPY-GPHC_Y5V_6.3V-to-50V_5.pdf?src-supplier=Avnet+Europe, ComponentLink2URL=http://www.yageo.com/documents/recent/UPY-GPHC_Y5V_6.3V-to-50V_5.pdf?src-supplier=Avnet+Europe, ComponentLink3Description=https://www.verical.com/server-webapp/html/getDatasheet?partID=403611&src-supplier=Verical, ComponentLink3URL=https://www.verical.com/server-webapp/html/getDatasheet?partID=403611&src-supplier=Verical, ComponentLink4Description=http://www.mouser.com/ds/2/447/Yageo_UPY-GP_NP0_16V-to-50V_9-358835.pdf?src-supplier=Mouser, ComponentLink4URL=http://www.mouser.com/ds/2/447/Yageo_UPY-GP_NP0_16V-to-50V_9-358835.pdf?src-supplier=Mouser, ComponentLink5Description=http://www.farnell.com/datasheets/1132289.pdf?src-supplier=Element14, ComponentLink5URL=http://www.farnell.com/datasheets/1132289.pdf?src-supplier=Element14, Composition=Ceramic, Depth=0.8mm, Halogen Free="Halogen Free", Height=0.8mm, Lead Free="Lead Free", Length=1.6mm, Manufacturer Part Number=CC0603ZRY5V9BB104, Mount="Surface Mount", Number of Pins=2, Packaging="Tape and Reel", Pricing 1="1=0.1, 10=0.075, 100=0.0334, 500=0.02386, 1000=0.01874 (USD)", Radiation Hardening=No, REACH SVHC="No SVHC", Stock 1=15000880, Supplier 1=Digi-Key, Termination=SMD/SMT, Thickness=0.035inch, Voltage Rating=50V, Voltage Rating (DC)=50V, Width=0.031inch
C11 C12: library part CC0603KRX5R8BB105, "CAP CER 1UF 25V X5R 0603", Case Code (Imperial)=0603, Case Code (Metric)=1608, Dielectric=X5R, Manufacturer=Yageo, Max Operating Temperature=85°C, Min Operating Temperature=-55°C, Package Quantity=1, Supplier Part Number 1=311-1445-1-ND, Tolerance=10%, Voltage Rating=25V, Capacitance=1uF, Case/Package=0603, Category="Ceramic Capacitors", ComponentLink1Description=https://datasheet.ciiva.com/176/mlccorderingcode-176785.pdf?src-supplier=Digi-Key, ComponentLink1URL=https://datasheet.ciiva.com/176/mlccorderingcode-176785.pdf?src-supplier=Digi-Key, ComponentLink2Description=https://datasheet.ciiva.com/176/mlccorderingcode-176786.pdf?src-supplier=Digi-Key, ComponentLink2URL=https://datasheet.ciiva.com/176/mlccorderingcode-176786.pdf?src-supplier=Digi-Key, ComponentLink3Description=https://datasheet.ciiva.com/176/mlccorderingcode-176787.pdf?src-supplier=Digi-Key, ComponentLink3URL=https://datasheet.ciiva.com/176/mlccorderingcode-176787.pdf?src-supplier=Digi-Key, ComponentLink4Description=https://datasheet.ciiva.com/17436/upy-gphc-x5r-4v-to-50v-12-17436952.pdf?src-supplier=Avnet+Europe, ComponentLink4URL=https://datasheet.ciiva.com/17436/upy-gphc-x5r-4v-to-50v-12-17436952.pdf?src-supplier=Avnet+Europe, ComponentLink5Description=https://datasheet.ciiva.com/7978/1525783-7978171.pdf?src-supplier=Element14, ComponentLink5URL=https://datasheet.ciiva.com/7978/1525783-7978171.pdf?src-supplier=Element14, ComponentLink6Description=https://datasheet.ciiva.com/11586/upy-gphc-x5r-4v-to-50v-12-11586318.pdf?src-supplier=Avnet, ComponentLink6URL=https://datasheet.ciiva.com/11586/upy-gphc-x5r-4v-to-50v-12-11586318.pdf?src-supplier=Avnet, Construction=Flat, Depth=0.8mm, Halogen Free="Halogen Free", Height=0.8mm, Lead Free="Lead Free", Length=1.6mm, Manufacturer Part Number=CC0603KRX5R8BB105, Mount="Surface Mount", Number of Pins=2, Packaging="Tape and Reel", Pricing 1="1=0.12000, 10=0.08400, 50=0.04760, 100=0.03940, 500=0.02764, 1000=0.02288 (USD)", Radiation Hardening=No, REACH SVHC="No SVHC", RoHS=Yes, RoHS Compliant=Yes, Series=CC, Stock 1=919939, Supplier 1=Digi-Key, Termination=SMD/SMT, Thickness=0.035inch, Voltage Rating (DC)=25V, Width=0.031inch
C14 C15: library part GRM188R6YA225KA12D, "CAP, 2.2µF, 35V, 10%, X5R, 0603", Case Code (Imperial)=0603, Case Code (Metric)=1608, Dielectric=X5R, Manufacturer=Murata, Max Operating Temperature=85°C, Min Operating Temperature=-55°C, Package Quantity=4000, Supplier Part Number 1=490-7204-1-ND, Tolerance=10%, Voltage=35V, Capacitance=2.2uF, Case/Package=0603, Category="Ceramic Capacitors", ComponentLink1Description=https://datasheet.ciiva.com/14906/partnumbering-e-01-14906490.pdf?src-supplier=Digi-Key, ComponentLink1URL=https://datasheet.ciiva.com/14906/partnumbering-e-01-14906490.pdf?src-supplier=Digi-Key, ComponentLink2Description=https://datasheet.ciiva.com/14906/partnumbering-e-01-14906491.pdf?src-supplier=Digi-Key, ComponentLink2URL=https://datasheet.ciiva.com/14906/partnumbering-e-01-14906491.pdf?src-supplier=Digi-Key, ComponentLink3Description=https://datasheet.ciiva.com/14906/partnumbering-e-01-14906492.pdf?src-supplier=Digi-Key, ComponentLink3URL=https://datasheet.ciiva.com/14906/partnumbering-e-01-14906492.pdf?src-supplier=Digi-Key, Depth=0.8mm, Height=0.8mm, Lead Free="Lead Free", Length=1.6mm, Manufacturer Part Number=GRM188R6YA225KA12D, Material=Ceramic, Mount="Surface Mount", Packaging="Tape and Reel", Pricing 1="1=0.21000, 10=0.14100, 50=0.08480, 100=0.07170, 500=0.04904, 1000=0.04338 (USD)", REACH SVHC="No SVHC", RoHS=Yes, RoHS Compliant=Yes, Series=GRM, Stock 1=81665, Supplier 1=Digi-Key, Termination=SMD/SMT, Thickness=0.035inch, Voltage Rating=35V, Voltage Rating (DC)=35V, Weight=0.000222oz, Width=0.8mm
C16 C17 C19 C20: library part CC0603JRNPO9BN100, "CAP CER 10PF 50V NP0 0603", Case Code (Imperial)=0603, Case Code (Metric)=1608, Dielectric=C0G, Insulation Resistance=100GR, Manufacturer=Yageo, Max Operating Temperature=125°C, Min Operating Temperature=-55°C, Package Quantity=1, Resistor Type=Ceramic, Supplier Part Number 1=311-1058-1-ND, Temperature Coefficient=30ppm/°C, Tolerance=5%, Voltage=50V, Capacitance=10pF, Case/Package=0603, Category="Ceramic Capacitors", ComponentLink1Description=https://datasheet.ciiva.com/5789/1734582-5789616.pdf?src-supplier=Farnell, ComponentLink1URL=https://datasheet.ciiva.com/5789/1734582-5789616.pdf?src-supplier=Farnell, ComponentLink2Description=https://datasheet.ciiva.com/26862/getdatasheetpartid-403524-26862758.pdf?src-supplier=Verical, ComponentLink2URL=https://datasheet.ciiva.com/26862/getdatasheetpartid-403524-26862758.pdf?src-supplier=Verical, ComponentLink3Description=https://datasheet.ciiva.com/11786/0900766b8079c870-11786407.pdf?src-supplier=RSComponents, ComponentLink3URL=https://datasheet.ciiva.com/11786/0900766b8079c870-11786407.pdf?src-supplier=RSComponents, ComponentLink4Description=https://datasheet.ciiva.com/144/mlccorderingcode-144651.pdf?src-supplier=Digi-Key, ComponentLink4URL=https://datasheet.ciiva.com/144/mlccorderingcode-144651.pdf?src-supplier=Digi-Key, ComponentLink5Description=https://datasheet.ciiva.com/46430/1835847-46430150.pdf?src-supplier=Element14, ComponentLink5URL=https://datasheet.ciiva.com/46430/1835847-46430150.pdf?src-supplier=Element14, ComponentLink6Description=https://datasheet.ciiva.com/144/mlccorderingcode-144649.pdf?src-supplier=Digi-Key, ComponentLink6URL=https://datasheet.ciiva.com/144/mlccorderingcode-144649.pdf?src-supplier=Digi-Key, ComponentLink7Description=https://datasheet.ciiva.com/144/mlccorderingcode-144650.pdf?src-supplier=Digi-Key, ComponentLink7URL=https://datasheet.ciiva.com/144/mlccorderingcode-144650.pdf?src-supplier=Digi-Key, ComponentLink8Description=https://datasheet.ciiva.com/8033/1734582-8033706.pdf?src-supplier=Element14, ComponentLink8URL=https://datasheet.ciiva.com/8033/1734582-8033706.pdf?src-supplier=Element14, ComponentLink9Description=https://datasheet.ciiva.com/16625/upy-gp-np0-16v-to-50v-8-16625514.pdf?src-supplier=Avnet+Europe, ComponentLink9URL=https://datasheet.ciiva.com/16625/upy-gp-np0-16v-to-50v-8-16625514.pdf?src-supplier=Avnet+Europe, ComponentLink10Description=https://datasheet.ciiva.com/5425/upy-gp-np0-16v-to-50v-8-5425564.pdf?src-supplier=Mouser, ComponentLink10URL=https://datasheet.ciiva.com/5425/upy-gp-np0-16v-to-50v-8-5425564.pdf?src-supplier=Mouser, ComponentLink11Description=https://datasheet.ciiva.com/7978/1132289-7978126.pdf?src-supplier=Element14, ComponentLink11URL=https://datasheet.ciiva.com/7978/1132289-7978126.pdf?src-supplier=Element14, ComponentLink12Description=https://datasheet.ciiva.com/8033/1734582-8033710.pdf?src-supplier=Element14, ComponentLink12URL=https://datasheet.ciiva.com/8033/1734582-8033710.pdf?src-supplier=Element14, Depth=0.8mm, Height=0.8mm, Lead Free="Lead Free", Length=1.6mm, Manufacturer Part Number=CC0603JRNPO9BN100, Mount="Surface Mount", Number of Pins=2, Packaging="Tape and Reel", Pricing 1="1=0.10000, 10=0.04100, 50=0.02220, 100=0.01810, 500=0.01296, 1000=0.01018 (USD)", Radiation Hardening=No, REACH SVHC="No SVHC", RoHS=Yes, RoHS Compliant=Yes, Series=CC, Stock 1=588987, Supplier 1=Digi-Key, Termination=SMD/SMT, Thickness=0.035inch, Voltage Rating=50V, Voltage Rating (DC)=50V, Width=0.031inch
C26: library part EMK105ABJ225KV-F, "CAP CER 2.2UF 16V X5R 0402", Case Code (Imperial)=0402, Case Code (Metric)=1005, Manufacturer="Taiyo Yuden", Max Operating Temperature=85°C, Min Operating Temperature=-55°C, Supplier Part Number 1=587-6002-1-ND, Tolerance=10%, Voltage Rating=16V, Capacitance=2.2uF, Case/Package=0402, ComponentLink1Description=http://ds.yuden.co.jp/TYCOMPAS/ut/detail.do?productNo=EMK105ABJ225KV-F&amp;fileName=EMK105ABJ225KV-F_SS&amp;mode=specSheetDownload&src-supplier=Digi-Key, ComponentLink1URL=http://ds.yuden.co.jp/TYCOMPAS/ut/detail.do?productNo=EMK105ABJ225KV-F&amp;fileName=EMK105ABJ225KV-F_SS&amp;mode=specSheetDownload&src-supplier=Digi-Key, ComponentLink2Description="https://ds.yuden.co.jp/TYCOMPAS/ut/detail?pn=EMK105ABJ225KV-F &amp;u=M&src-supplier=Digi-Key", ComponentLink2URL="https://ds.yuden.co.jp/TYCOMPAS/ut/detail?pn=EMK105ABJ225KV-F &amp;u=M&src-supplier=Digi-Key", Lead Free="Lead Free", Manufacturer Part Number=EMK105ABJ225KV-F, Mount="Surface Mount", Packaging="Tape and Reel", Pricing 1="1=0.2, 10=0.139, 100=0.0706, 500=0.04834, 1000=0.04276, 2500=0.0409, 5000=0.03718 (USD)", Stock 1=755, Supplier 1=Digi-Key
C27: library part C1608X5R1E106M080AC, "CAP CER 10UF 25V X5R 0603", Case Code (Imperial)=0603, Case Code (Metric)=1608, Dielectric=X5R, Dielectric Material=Ceramic, Manufacturer=TDK, Max Operating Temperature=85°C, Min Operating Temperature=-55°C, Package Quantity=1, Supplier Part Number 1=445-9015-1-ND, Tolerance=20%, Voltage Rating=25V, Capacitance=10uF, Case/Package=0603, Composition=Ceramic, Depth=0.8mm, Height=0.8mm, Lead Free="Lead Free", Length=1.6mm, Manufacturer Part Number=C1608X5R1E106M080AC, Mount="Surface Mount", Packaging="Tape and Reel", Pricing 1="1=0.96, 10=0.704, 100=0.483, 500=0.38238, 1000=0.322 (USD)", REACH SVHC="No SVHC", Stock 1=61681, Supplier 1=Digi-Key, Termination=SMD/SMT, Thickness=0.039inch, Voltage Rating (DC)=25V, Weight=7.1E-05oz, Width=0.8mm
C28: library part CC0603KRX7R9BB221, "RES SMD 220pF ±10% 50V X7R 0603", Case Code (Imperial)=0603, Case Code (Metric)=1608, Dielectric=X7R, Dielectric Material=Ceramic, Insulation Resistance=100GR, Manufacturer=Yageo, Max Operating Temperature=125°C, Min Operating Temperature=-55°C, Package Quantity=1, Supplier Part Number 1=2006602, Tolerance=10%, Voltage Rating=50V, Capacitance=220pF, Case/Package=0603, Category="Ceramic Capacitors", ComponentLink1Description=https://datasheet.ciiva.com/7978/1489800-7978170.pdf?src-supplier=Element14, ComponentLink1URL=https://datasheet.ciiva.com/7978/1489800-7978170.pdf?src-supplier=Element14, ComponentLink2Description=https://datasheet.ciiva.com/144/mlccorderingcode-144452.pdf?src-supplier=Digi-Key, ComponentLink2URL=https://datasheet.ciiva.com/144/mlccorderingcode-144452.pdf?src-supplier=Digi-Key, ComponentLink3Description=https://datasheet.ciiva.com/144/mlccorderingcode-144451.pdf?src-supplier=Digi-Key, ComponentLink3URL=https://datasheet.ciiva.com/144/mlccorderingcode-144451.pdf?src-supplier=Digi-Key, ComponentLink4Description=https://datasheet.ciiva.com/144/mlccorderingcode-144453.pdf?src-supplier=Digi-Key, ComponentLink4URL=https://datasheet.ciiva.com/144/mlccorderingcode-144453.pdf?src-supplier=Digi-Key, ComponentLink5Description=https://datasheet.ciiva.com/5425/upy-gphc-x7r-6-3v-to-50v-8-5425432.pdf?src-supplier=Mouser, ComponentLink5URL=https://datasheet.ciiva.com/5425/upy-gphc-x7r-6-3v-to-50v-8-5425432.pdf?src-supplier=Mouser, ComponentLink6Description=https://datasheet.ciiva.com/8033/1489800-8033855.pdf?src-supplier=Element14, ComponentLink6URL=https://datasheet.ciiva.com/8033/1489800-8033855.pdf?src-supplier=Element14, ComponentLink7Description=https://datasheet.ciiva.com/11587/upy-gphc-x7r-6-3v-to-50v-8-11587223.pdf?src-supplier=Avnet, ComponentLink7URL=https://datasheet.ciiva.com/11587/upy-gphc-x7r-6-3v-to-50v-8-11587223.pdf?src-supplier=Avnet, Depth=0.8mm, Halogen Free="Halogen Free", Height=0.8mm, Lead Free="Lead Free", Length=1.6mm, Manufacturer Part Number=CC0603KRX7R9BB221, Mount="Surface Mount", Number of Pins=2, Packaging="Tape and Reel", Pricing 1="4000=0.00700, 12000=0.00700 (GBP)", Radiation Hardening=No, REACH SVHC="No SVHC", Resistor Type=Ceramic, RoHS=Yes, RoHS Compliant=Yes, Series=CC, Stock 1=3500, Supplier 1=RSComponents, Termination=SMD/SMT, Thickness=0.035inch, Voltage Rating (DC)=50V, Width=0.031inch
C29: library part F981E105MMA, "CAP TANT 1UF 20% 25V 0603", Case/Package=0603, ESR (Equivalent Series Resistance)=10R, Manufacturer="Kyocera AVX", Max Operating Temperature=125°C, Min Operating Temperature=-55°C, Supplier Part Number 1=478-8658-1-ND, Tolerance=20%, Voltage Rating=25V, Capacitance=1uF, Category="Tantalum Capacitors", ComponentLink1Description=http://www.mouser.com/ds/2/40/f98-775787.pdf?src-supplier=Mouser, ComponentLink1URL=http://www.mouser.com/ds/2/40/f98-775787.pdf?src-supplier=Mouser, ComponentLink2Description=http://www.farnell.com/datasheets/2096554.pdf?src-supplier=Newark, ComponentLink2URL=http://www.farnell.com/datasheets/2096554.pdf?src-supplier=Newark, ComponentLink3Description=http://datasheets.avx.com/F98.pdf?src-supplier=Digi-Key, ComponentLink3URL=http://datasheets.avx.com/F98.pdf?src-supplier=Digi-Key, Features="General Purpose", Manufacturer Part Number=F981E105MMA, Mount="Surface Mount", Packaging="Tape and Reel", Pricing 1="1=0.79000, 10=0.55800, 50=0.42220, 100=0.36770, 500=0.27236, 1000=0.23151 (USD)", RoHS=Yes, RoHS Compliant=Yes, Stock 1=11167, Supplier 1=Digi-Key
D1: "20V 450mV@500mA 500mA SOD-123 Schottky Barrier Diodes (SBD) ROHS", Manufacturer=Yangzhou, Package=SOD-123, Manufacturer Part No=MBR0520
J1: "USB 3.0 1 9 Male Type-A SMD USB Connectors ROHS", Manufacturer="XKB Connectivity", Mounting Style="Surface Mount", Number of Ports=1, Standard="USB 3.0"
J2: "0.5MM PITCH - 80 POS - RIGHT ANG", Manufacturer="Kyocera AVX", Package=Custom, ComponentLink1Description=LCSC, ComponentLink1URL=https://lcsc.com/product-detail/FFC-span-style-background-color-ff0-FPC-span-Connectors_Kyocera-046288080000846_C513346.html, Manufacturer Part No=046288080000846+
J3: "CONN FFC FPC 26POS 0.50MM R/A", Manufacturer=Hirose, Manufacturer Part Number=FH34SRJ-8S-0.5SH(99), Supplier Part Number 1=1362475, Category="FFC / FPC", ComponentLink1Description=https://datasheet.ciiva.com/18561/ed-fh34s-20140305-18561974.pdf?src-supplier=Digi-Key, ComponentLink1URL=https://datasheet.ciiva.com/18561/ed-fh34s-20140305-18561974.pdf?src-supplier=Digi-Key, Pricing 1="5=2.79500, 25=2.28400, 100=2.17100, 250=1.96400 (USD)", RoHS=Yes, Stock 1=190, Supplier 1=RSComponents
L1: "Ferrite Beads 120Ohm 25% 100MHz 1.2A 0.13Ohm DCR 0603 Automotive T/R", Case Code (Imperial)=0603, Case Code (Metric)=1608, DC Resistance (DCR)=130mR, Manufacturer="Taiyo Yuden", Max Current Rating=1.2A, Max DC Current=900mA, Max Operating Temperature=125°C, Min Operating Temperature=-40°C, Package Quantity=4000, Ratings=AEC-Q200, Test Frequency=100MHz, Tolerance=25%, Case/Package=0603, Category="Ferrite Beads and Chips", ComponentLink1Description=http://www.mouser.com/ds/2/396/chipbeads01_e-559265.pdf?src-supplier=Mouser, ComponentLink1URL=http://www.mouser.com/ds/2/396/chipbeads01_e-559265.pdf?src-supplier=Mouser, ComponentLink2Description=http://ds.yuden.co.jp/TYCOMPAS/ut/detail.do?productNo=FBMH1608HL121-TV&fileName=FBMH1608HL121-TV_SS&mode=specSheetDownload&src-supplier=Digi-Key, ComponentLink2URL=http://ds.yuden.co.jp/TYCOMPAS/ut/detail.do?productNo=FBMH1608HL121-TV&fileName=FBMH1608HL121-TV_SS&mode=specSheetDownload&src-supplier=Digi-Key, ComponentLink3Description=https://www.yuden.co.jp/ut/product/category/emisuppression/FBMH1608HL121-TV_SS.pdf?src-supplier=Avnet, ComponentLink3URL=https://www.yuden.co.jp/ut/product/category/emisuppression/FBMH1608HL121-TV_SS.pdf?src-supplier=Avnet, Core Material=Ferrite, Height=0.8mm, Impedance=120R, Length=0.063inch, Manufacturer Part Number=FBMH1608HL121-TV, Mount="Surface Mount", Number of Lines=1, Packaging="Tape and Reel", Pricing 1="4000=0.05939, 8000=0.05429, 16000=0.05185, 24000=0.04942, 32000=0.04698 (USD)", RoHS=Yes, RoHS Compliant=Yes, Supplier 1=Avnet, Supplier Part Number 1=FBMH1608HL121-TV, Termination=SMD/SMT, Weight=7.1E-05oz, Width=0.8mm
L2: library part 74437368033, "FIXED IND 3.3UH 8A 11.8 MOHM SMD", Case/Package=Nonstandard, Current Rating=8A, DC Resistance (DCR)=11.8mR, Frequency=22MHz, Inductance=3.3uH, Inductance Tolerance=20%, Manufacturer="Wurth Electronics", Max Operating Temperature=125°C, Min Operating Temperature=-40°C, Package Quantity=500, Resistor Type=Wirewound, Saturation Current=23A, Series Resistance=11.8MR, Supplier Part Number 1=732-3388-1-ND, Test Frequency=100kHz, Category="Fixed Inductors", ComponentLink1Description=http://www.farnell.com/datasheets/1735871.pdf?src-supplier=Element14, ComponentLink1URL=http://www.farnell.com/datasheets/1735871.pdf?src-supplier=Element14, ComponentLink2Description=http://www.mouser.com/ds/2/445/74437368022-538992.pdf?src-supplier=Mouser, ComponentLink2URL=http://www.mouser.com/ds/2/445/74437368022-538992.pdf?src-supplier=Mouser, ComponentLink3Description=http://katalog.we-online.de/pbs/datasheet/74437368022.pdf?src-supplier=Digi-Key, ComponentLink3URL=http://katalog.we-online.de/pbs/datasheet/74437368022.pdf?src-supplier=Digi-Key, ComponentLink4Description=http://documents.rs-components.com/techlib://itc_doclist_GB.htm?stockno=7568629&src-supplier=RSComponents, ComponentLink4URL=http://documents.rs-components.com/techlib://itc_doclist_GB.htm?stockno=7568629&src-supplier=RSComponents, ComponentLink5Description=http://www.produktinfo.conrad.com/datenblaetter/1000000-1099999/001087607-da-01-ml-WE_LHMI_SMD_SPEICHERDROSSEL_744373_de_en.pdf?src-supplier=Conrad, ComponentLink5URL=http://www.produktinfo.conrad.com/datenblaetter/1000000-1099999/001087607-da-01-ml-WE_LHMI_SMD_SPEICHERDROSSEL_744373_de_en.pdf?src-supplier=Conrad, ComponentLink6Description=https://datasheet.ciiva.com/7354/74437368033-7354466.pdf?src-supplier=Newark, ComponentLink6URL=https://datasheet.ciiva.com/7354/74437368033-7354466.pdf?src-supplier=Newark, ComponentLink7Description=https://datasheet.ciiva.com/7691/1735872-7691596.pdf?src-supplier=Element14, ComponentLink7URL=https://datasheet.ciiva.com/7691/1735872-7691596.pdf?src-supplier=Element14, ComponentLink8Description=https://datasheet.ciiva.com/4961/74437368033-89775-4961151.pdf?src-supplier=Mouser, ComponentLink8URL=https://datasheet.ciiva.com/4961/74437368033-89775-4961151.pdf?src-supplier=Mouser, ComponentLink9Description=https://datasheet.ciiva.com/6693/74437368033-6693468.pdf?src-supplier=Digi-Key, ComponentLink9URL=https://datasheet.ciiva.com/6693/74437368033-6693468.pdf?src-supplier=Digi-Key, ComponentLink10Description=https://datasheet.ciiva.com/6693/74437368033-6693470.pdf?src-supplier=Digi-Key, ComponentLink10URL=https://datasheet.ciiva.com/6693/74437368033-6693470.pdf?src-supplier=Digi-Key, ComponentLink11Description=https://datasheet.ciiva.com/6693/74437368033-6693471.pdf?src-supplier=Digi-Key, ComponentLink11URL=https://datasheet.ciiva.com/6693/74437368033-6693471.pdf?src-supplier=Digi-Key, ComponentLink12Description=https://datasheet.ciiva.com/48690/001087608-da-01-ml-we-lhmi-smd-speicherdrossel-744373-de-en-48690487.pdf?src-supplier=Conrad, ComponentLink12URL=https://datasheet.ciiva.com/48690/001087608-da-01-ml-we-lhmi-smd-speicherdrossel-744373-de-en-48690487.pdf?src-supplier=Conrad, Core Material=Ferrite,Composite, Depth=10mm, Height=3.8mm, Height - Seated (Max)=0.157inch, Length=11mm, Manufacturer Part Number=74437368033, Max DC Current=8A, Mount="Surface Mount", Packaging="Tape and Reel", Pricing 1="1=2.41000, 10=2.35900, 50=2.17700, 100=1.99600, 250=1.90500 (USD)", REACH SVHC=Unknown, RMS Current (Irms)=8A, RoHS=Yes, RoHS Compliant=Yes, Self Resonant Frequency=22MHz, Series=WE-LHMI, Shielding=Shielded, Stock 1=1240, Supplier 1=Digi-Key, Termination=SMD/SMT, Tolerance=20%, Width=10mm
Q1: "20V 1.6A 500mW 115mΩ@4.5V,1.6A 1.5V@250μA P Channel SOT-23 MOSFETs ROHS", Manufacturer=UMW, Package=SOT-23, Manufacturer Part No=FDN338P
Q2: "SOT-23 MOSFETs ROHS", Manufacturer=UMW, Package=SOT-23, ComponentLink1Description=LCSC, ComponentLink1URL=https://lcsc.com/product-detail/MOSFETs_UMW-Youtai-Semiconductor-Co-Ltd-FDN335N_C347512.html, Manufacturer Part No=FDN335N
R1: library part RC0201JR-070RL, "RES SMD 0 OHM JUMPER 1/20W 0201", Case Code (Imperial)=0201, Case Code (Metric)=0603, Manufacturer=Yageo, Max Operating Temperature=125°C, Max Power Dissipation=50mW, Min Operating Temperature=-55°C, Package Quantity=10000, Resistance Tolerance=5%, Resistor Type="Thick Film", Supplier Part Number 1=311-0.0NCT-ND, Voltage Rating=25V, Case/Package=0201, Category="Chip SMD Resistors", ComponentLink1Description=https://datasheet.ciiva.com/7672/1563626-7672247.pdf?src-supplier=Element14, ComponentLink1URL=https://datasheet.ciiva.com/7672/1563626-7672247.pdf?src-supplier=Element14, ComponentLink2Description=https://datasheet.ciiva.com/7660/1421516-7660808.pdf?src-supplier=Element14, ComponentLink2URL=https://datasheet.ciiva.com/7660/1421516-7660808.pdf?src-supplier=Element14, ComponentLink3Description=https://datasheet.ciiva.com/7672/1563626-7672248.pdf?src-supplier=Element14, ComponentLink3URL=https://datasheet.ciiva.com/7672/1563626-7672248.pdf?src-supplier=Element14, ComponentLink4Description=https://datasheet.ciiva.com/16855/pyu-rc0201-51-rohs-l-8-16855994.pdf?src-supplier=Avnet+Europe, ComponentLink4URL=https://datasheet.ciiva.com/16855/pyu-rc0201-51-rohs-l-8-16855994.pdf?src-supplier=Avnet+Europe, ComponentLink5Description=https://datasheet.ciiva.com/28419/pyu-rc0201-51-rohs-l-8-28419660.pdf?src-supplier=Avnet+Europe, ComponentLink5URL=https://datasheet.ciiva.com/28419/pyu-rc0201-51-rohs-l-8-28419660.pdf?src-supplier=Avnet+Europe, ComponentLink6Description=https://datasheet.ciiva.com/46391/1421516-46391340.pdf?src-supplier=Element14, ComponentLink6URL=https://datasheet.ciiva.com/46391/1421516-46391340.pdf?src-supplier=Element14, ComponentLink7Description=https://datasheet.ciiva.com/8896/pyu-rc0201-51-rohs-l-8-8896143.pdf?src-supplier=Avnet, ComponentLink7URL=https://datasheet.ciiva.com/8896/pyu-rc0201-51-rohs-l-8-8896143.pdf?src-supplier=Avnet, Construction=Rectangular, Contact Plating=Tin,Matte, Depth=0.3mm, Features="Moisture Resistant", Height=0.01inch, Lead Free="Lead Free", Length=0.6mm, Manufacturer Part Number=RC0201JR-070RL, Military Standard=Not, Number of Terminations=2, Packaging="Tape and Reel", Power Rating=50mW, Pricing 1="1=0.10000, 10=0.03600, 25=0.02640, 50=0.02000, 100=0.01480, 250=0.01128, 500=0.00904, 1000=0.00665, 5000=0.00477 (USD)", Radiation Hardening=No, REACH SVHC=Unknown, Resistance=0R, RoHS=Yes, RoHS Compliant=Yes, Series=RC, Size Code=0201, Stock 1=11079, Supplier 1=Digi-Key, Termination=SMD/SMT, Tolerance=5%, Voltage Rating (DC)=25V, Weight=6E-06oz, Width=0.012inch
R2 R3 R6 R7 R8 R9 R10 R11 R12 R13 R14 R15 R16 R17 R18 R19 R20 R21 R22 R23 R24 R25 R26 R27 R28 R29 R30 R31 R32 R33 R34 R35 R36 R37 R38 R39 R40 R41 R42 R110 R111 R112 R113 R114 R115 R116 R117 R118: library part AC0603JR-0710KL, "RES SMD 10K OHM 5% 1/10W 0603", Case Code (Imperial)=0603, Case Code (Metric)=1608, Manufacturer=Yageo, Max Operating Temperature=155°C, Max Power Dissipation=100mW, Min Operating Temperature=-55°C, Package Quantity=1, Resistance=10kR, Resistor Type="Thick Film", Supplier Part Number 1=1029044, Temperature Coefficient=100ppm/°C, Tolerance=5%, Voltage Rating=50V, Case/Package=0603, Category="Chip SMD Resistors", ComponentLink1Description=https://datasheet.ciiva.com/5562/pyu-ac-51-rohs-l-2-5562553.pdf?src-supplier=Mouser, ComponentLink1URL=https://datasheet.ciiva.com/5562/pyu-ac-51-rohs-l-2-5562553.pdf?src-supplier=Mouser, Construction=Rectangular, Depth=0.8mm, Features="Moisture Resistant,Automotive AEC-Q200,Anti-Sulfur", Height=0.022inch, Lead Free="Lead Free", Length=0.063inch, Manufacturer Part Number=AC0603JR-0710KL, Military Standard=Not, Number of Terminations=2, Packaging="Tape and Reel", Power Rating=100mW, Pricing 1="5000=0.00540 (USD)", RoHS=Yes, RoHS Compliant=Yes, Series=AC, Size Code=0603, Stock 1=1533000, Supplier 1="Future Electronics", Termination=SMD/SMT, Width=0.031inch
R4 R5 R43 R44 R45 R46 R47 R48 R49 R50 R51 R52 R53 R54 R55 R56 R57 R58 R59 R60 R61 R62 R63 R64 R65 R66 R67 R68 R69 R70 R71 R72 R73 R74 R75 R76 R77 R78 R79 R80 R81 R82 R83 R84 R85 R86 R87 R88 R89 R90 R91 R92 R93 R94 R95 R96 R97 R98 R99 R100 R101 R102 R103 R104 R105 R106 R107 R108 R109 R120 R121 R122 R123 R124 R125 R126 R127 R128 R129 R130 R131 R132: library part RC0402FR-0747KL, "RES SMD 47K OHM 1% 1/16W 0402", Case Code (Imperial)=0402, Case Code (Metric)=1005, Manufacturer=Yageo, Max Operating Temperature=155°C, Max Power Dissipation=63mW, Min Operating Temperature=-55°C, Package Quantity=1, Power Rating=62.5mW, Resistance=47kR, Supplier Part Number 1=311-47.0KLRDKR-ND, Temperature Coefficient=100ppm/°C, Tolerance=1%, Voltage Rating=50V, Case/Package=0402, ComponentLink1Description=http://www.yageo.com/documents/recent/PYu-RC0402_51_RoHS_L_6_r.pdf?src-supplier=Future+Electronics, ComponentLink1URL=http://www.yageo.com/documents/recent/PYu-RC0402_51_RoHS_L_6_r.pdf?src-supplier=Future+Electronics, ComponentLink2Description=http://www.farnell.com/datasheets/1018594.pdf?src-supplier=Element14, ComponentLink2URL=http://www.farnell.com/datasheets/1018594.pdf?src-supplier=Element14, ComponentLink3Description=https://www.verical.com/server-webapp/html/getDatasheet?partID=323748&src-supplier=Verical, ComponentLink3URL=https://www.verical.com/server-webapp/html/getDatasheet?partID=323748&src-supplier=Verical, ComponentLink4Description=http://www.yageo.com/documents/recent/PYu-RC_Group_51_RoHS_L_10.pdf?src-supplier=Digi-Key, ComponentLink4URL=http://www.yageo.com/documents/recent/PYu-RC_Group_51_RoHS_L_10.pdf?src-supplier=Digi-Key, Composition="Thick Film", Depth=0.5mm, Features="Moisture Resistant", Height=0.016inch, Lead Free="Lead Free", Length=1mm, Manufacturer Part Number=RC0402FR-0747KL, Military Standard=Not, Number of Terminations=2, Packaging="Tape and Reel", Pricing 1="1=0.1, 10=0.016, 100=0.0064, 1000=0.00289, 2500=0.00251, 5000=0.00207 (USD)", REACH SVHC=Unknown, Stock 1=0, Supplier 1=Digi-Key, Termination=SMD/SMT, Width=0.5mm